# Altium PCB 14MV1.PcbDoc (part 2 of 2)
Units mm, origin at the board's own origin, x right, y up, seen from the top; angles counter-clockwise.
Board outline 48 x 30 mm, 4 copper layers (Top Layer, Layer 1, Layer 2, Bottom Layer), stack 1.743 mm thick; 166 components, 120 nets, 638 pads, 401 vias.
Unrouted connection lines stored in the file: 3.
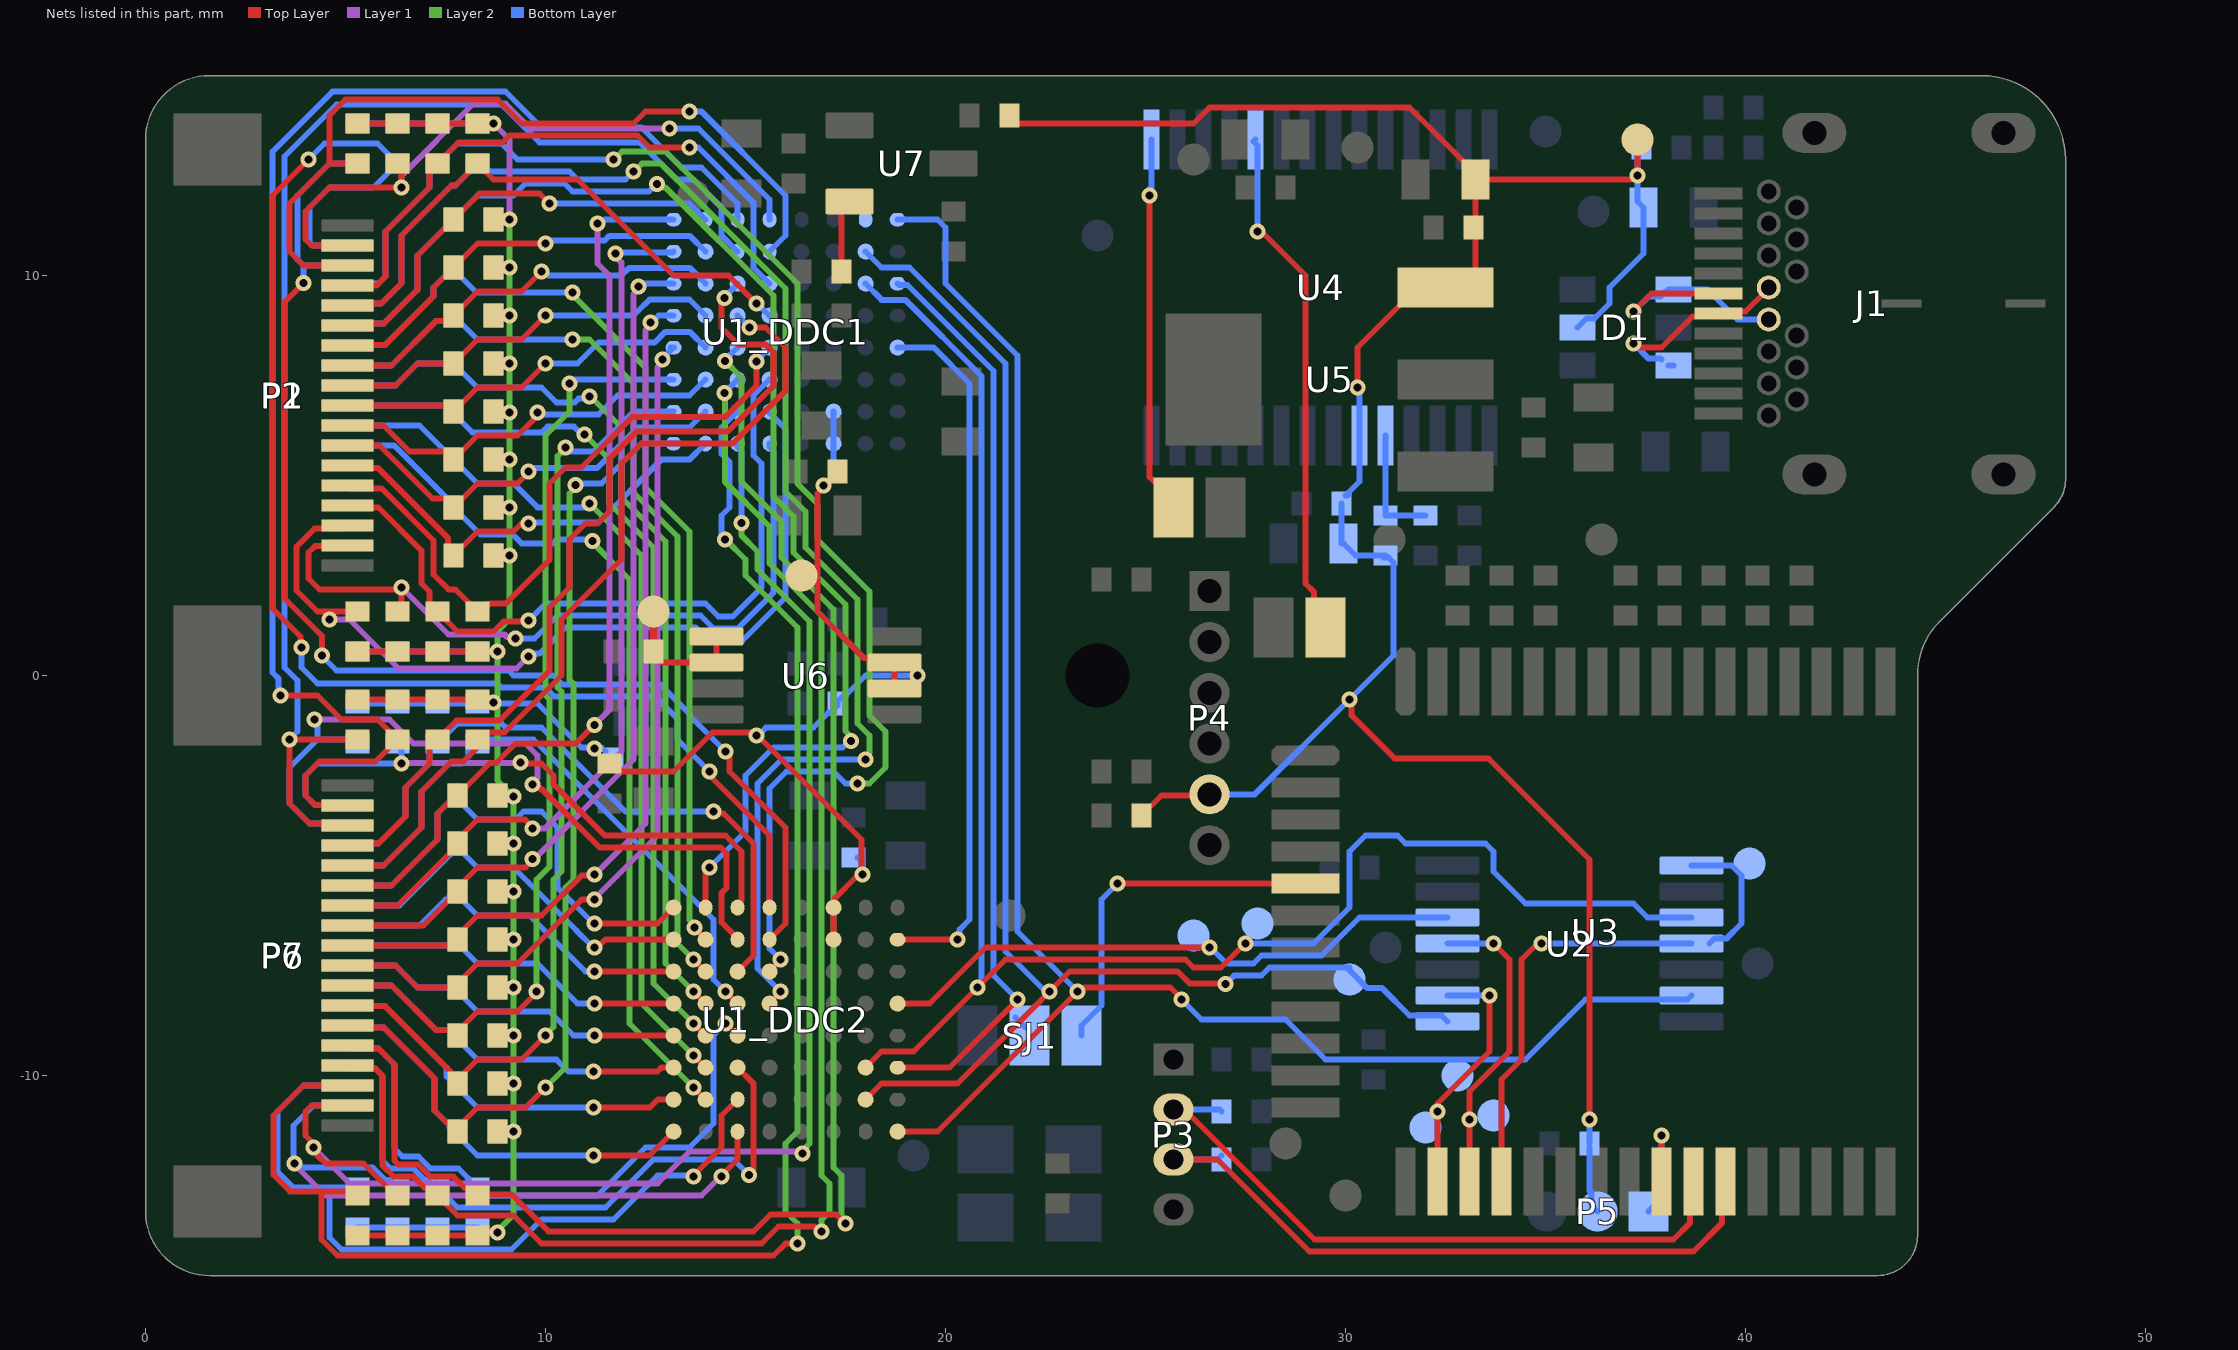
[diagram p4: the nets of this part, all layers, seen from the top]

## Via types
v1: diameter 0.4, hole 0.2, Top Layer to Bottom Layer, tented both sides, 401 vias

## Nets (pads, with @x,y where several pads share a name; then routed paths per layer and width w, separated by ;. In a path a pad name is that pad's centre, name@x,y a point inside that pad or via, vN(x,y) a via of type N, cw(c..) or ccw(c..) an arc to the next point about the centre after c; other vN are vias at no path point) (continued)
NetP1_7: P1.7 R7_DDC2.1 U1_DDC2.G2 | length 22.3
  Top Layer w0.15: v1(13.7,-10.3) U1_DDC2.G2@14,-10.6
  Layer 2 w0.15: v1(11.168,3.367) 11.168,3.333 12.1,2.401 12.1,-8.7 v1(13.7,-10.3)
  Bottom Layer w0.15: P1.7@5.05,5.75 6.216,5.75 7.5,4.466 7.5,4.45 7.55,4.4 7.55,4.35 R7_DDC2.1@7.6,4.3 ; R7_DDC2.1@7.7,4.2 7.7,4.15 7.85,4 7.9,4 8.375,3.525 9.176,3.525 9.401,3.3 10.182,3.3 10.282,3.4 11.075,3.4 11.108,3.367 v1(11.168,3.367)
NetP1_8: P1.8 R8_DDC2.1 U1_DDC2.F2 | length 22.2
  Top Layer w0.15: v1(13.7,-9.5) U1_DDC2.F2@14,-9.8
  Layer 2 w0.15: v1(11.1,4.3) 12.4,3 12.4,-8.2 v1(13.7,-9.5)
  Bottom Layer w0.15: P1.8@5.05,6.25 6.85,6.25 7.5,5.6 7.55,5.6 7.6,5.55 R8_DDC2.1@7.6,5.5 ; R8_DDC2.1@7.7,5.4 7.7,5.35 7.85,5.2 7.9,5.2 8.3,4.8 9.201,4.8 9.801,4.2 11,4.2 v1(11.1,4.3)
NetP1_9: P1.9 R9_DDC2.1 U1_DDC2.E2 | length 22.7
  Top Layer w0.15: v1(13.7,-8.7) U1_DDC2.E2@14,-9
  Layer 2 w0.15: v1(10.975,6.025) 11,6 11.6,5.4 11.6,4.3 12.7,3.2 12.7,-7.7 v1(13.7,-8.7)
  Bottom Layer w0.15: P1.9@5.05,6.75 7.55,6.75 R9_DDC2.1@7.7,6.6 7.7,6.55 8.175,6.075 9.901,6.075 10.051,6.225 10.707,6.225 10.907,6.025 v1(10.975,6.025)
NetP1_10: P1.10 R10_DDC2.1 U1_DDC2.D2 | length 23.2
  Top Layer w0.15: v1(13.7,-7.9) U1_DDC2.D2@14,-8.2
  Layer 2 w0.15: v1(11.1,6.975) 11.125,6.975 11.9,6.2 11.9,4.451 13,3.351 13,-7.2 v1(13.7,-7.9)
  Bottom Layer w0.15: P1.10@5.05,7.25 6.25,7.25 6.8,7.8 R10_DDC2.1@7.7,7.8 7.7,7.75 7.85,7.6 7.9,7.6 8.3,7.2 9.9,7.2 10.275,6.825 10.726,6.825 10.828,6.927 11.052,6.927 v1(11.1,6.975)
NetP1_11: P1.11 R11_DDC2.1 U1_DDC2.C2 | length 23.8
  Top Layer w0.15: v1(13.7,-7.1) U1_DDC2.C2@14,-7.4
  Layer 2 w0.15: v1(10.675,8.4) 11.1,8.4 12.2,7.3 12.2,4.576 13.3,3.476 13.3,-6.7 v1(13.7,-7.1)
  Bottom Layer w0.15: P1.11@5.05,7.75 6.15,7.75 7.267,8.867 7.667,8.867 R11_DDC2.1@7.7,8.9 ; R11_DDC2.1@7.7,9 7.7,8.95 7.85,8.8 7.9,8.8 8.3,8.4 v1(10.675,8.4)
NetP1_12: P1.12 R12_DDC2.1 U1_DDC2.B2 | length 24.4
  Top Layer w0.15: v1(13.725,-6.3) 13.725,-6.313 14,-6.587 U1_DDC2.B2@14,-6.6
  Layer 2 w0.15: v1(10.675,9.575) 10.7,9.55 10.7,9.499 12.5,7.699 12.5,4.7 13.6,3.6 13.6,-6.107 13.725,-6.232 v1(13.725,-6.3)
  Bottom Layer w0.15: P1.12@5.05,8.25 5.062,8.262 5.983,8.262 7.2,9.479 7.2,9.7 7.5,10 7.55,10 R12_DDC2.1@7.7,10.15 ; v1(10.675,9.575) 8.275,9.575 R12_DDC2.1@7.7,10.15 ; R12_DDC2.1@7.7,10.15 R12_DDC2.1@7.7,10.2 R12_DDC2.1@7.7,10.15
NetP1_13: P1.13 R13_DDC2.1 U1_DDC2.A2 | length 32.5
  Top Layer w0.15: U1_DDC2.A2@14,-5.8 14,-5 14,-4.9 v1(14.1,-4.8)
  Layer 2 w0.15: v1(12.787,12.287) 12.855,12.287 12.943,12.199 13.001,12.199 15.7,9.5 15.7,4.476 16.2,3.976 16.2,3.076 17.5,1.776 17.5,-1.387 17.637,-1.524 v1(17.637,-1.638)
  Bottom Layer w0.15: P1.13@5.05,8.75 5.1,8.8 5.956,8.8 6.8,9.644 6.8,10.5 7.475,11.175 7.525,11.175 7.6,11.25 R13_DDC2.1@7.6,11.3 ; R13_DDC2.1@7.7,11.4 7.7,11.45 7.875,11.625 7.925,11.625 8.3,12 9.2,12 9.5,12.3 9.7,12.3 10.475,12.3 10.675,12.1 12.587,12.1 12.774,12.287 v1(12.787,12.287) ; v1(14.1,-4.8) 15,-3.9 15,-2.5 15.7,-1.8 17.424,-1.8 17.586,-1.638 v1(17.637,-1.638)
NetP1_14: P1.14 R14_DDC2.1 U1_DDC2.D4 | length 36.4
  Top Layer w0.15: U1_DDC2.D4@15.6,-8.2 15.6,-8.188 15.875,-7.913 v1(15.875,-7.9)
  Layer 2 w0.15: v1(12.2,12.6) 12.213,12.6 12.413,12.8 12.876,12.8 16,9.676 16,4.6 16.5,4.1 16.5,3.2 17.8,1.9 17.8,-1.2 18.1,-1.5 18.1,-1.932 18,-2.032 v1(18,-2.1)
  Bottom Layer w0.15: P1.14@5.05,9.25 5.1,9.3 5.89,9.3 6.4,9.81 6.4,11 7.65,12.25 7.75,12.25 8.075,12.575 8.075,12.625 8.25,12.8 R14_DDC2.1@8.3,12.8 8.475,12.625 8.588,12.625 8.613,12.6 10.6,12.6 10.8,12.4 12,12.4 v1(12.2,12.6) v1@12.3,12.6 ; v1(15.875,-7.9) 15.3,-7.325 15.3,-2.7 15.9,-2.1 v1(18,-2.1)
NetP1_15: P1.15 R15_DDC2.1 U1_DDC2.C4 | length 36.5
  Top Layer w0.15: U1_DDC2.C4@15.6,-7.4 15.6,-7.388 15.875,-7.113 v1(15.875,-7.1)
  Layer 2 w0.15: v1(11.7,12.9) 11.713,12.9 11.913,13.1 13,13.1 16.3,9.8 16.3,4.799 16.8,4.299 16.8,3.4 18.1,2.1 18.1,-1 18.5,-1.4 18.5,-2.3 18.1,-2.7 v1(17.8,-2.7)
  Bottom Layer w0.15: P1.15@5.05,9.75 5.1,9.8 5.824,9.8 6,9.976 6,11.1 7.1,12.2 7.1,12.65 7.25,12.8 R15_DDC2.1@7.3,12.8 7.35,12.8 7.525,12.975 7.525,13.025 7.8,13.3 8.9,13.3 9.3,12.9 v1(11.7,12.9) ; v1(15.875,-7.1) 15.6,-6.825 15.6,-2.824 16.024,-2.4 17.2,-2.4 17.499,-2.699 v1(17.8,-2.7)
NetP1_16: P1.16 R16_DDC2.1 U1_DDC2.B4 | length 31.6
  Top Layer w0.15: v1(3.95,9.81) 3.475,9.335 3.475,1.925 4.411,0.989 v1(4.411,0.496) ; v1(14.5,-1.9) 14.6,-2 14.6,-2.4 16,-3.8 16,-6.2 U1_DDC2.B4@15.6,-6.6
  Bottom Layer w0.15: v1(3.95,9.81) 3.95,10.25 ; v1(4.411,0.496) 4.411,0.489 4.775,0.125 9.075,0.125 9.2,0 10.2,0 10.425,-0.225 12.868,-0.225 13.6,-0.957 13.6,-1 v1(14.5,-1.9) ; P1.16@5.05,10.25 3.95,10.25 ; R16_DDC2.1@5.2,12.8 4.6,12.8 3.8,12 3.8,10.4 3.95,10.25
NetP1_17: P1.17 R17_DDC2.1 U1_DDC2.A4 | length 36
  Top Layer w0.15: v1(3.9,0.7) 3.874,0.726 3.874,0.976 3.175,1.675 3.175,12 v1(4.075,12.9) ; v1(14.1,-2.4) 14.05,-2.45 15.6,-4 U1_DDC2.A4@15.6,-5.8
  Bottom Layer w0.15: v1(3.9,0.7) 3.9,0.2 4.3,-0.2 8.799,-0.2 8.899,-0.3 10,-0.3 10.225,-0.525 12.743,-0.525 13.3,-1.082 13.3,-1.6 v1(14.1,-2.4) ; v1(4.075,12.9) 4.475,13.3 5.8,13.3 6.075,13.025 6.075,12.975 6.25,12.8 R17_DDC2.1@6.3,12.8 ; P1.17@5.05,10.75 4.188,10.75 4.1,10.838 4.1,11.7 4.6,12.2 5.7,12.2 6.1,12.6 6.1,12.65 6.15,12.7 R17_DDC2.1@6.2,12.7
NetP2_2: P2.2 R2_DDC1.1 U1_DDC1.H4 | length 16.8
  Top Layer w0.15: P2.2@5.05,10.75 4.15,10.75 4,10.9 4,11.6 4.6,12.2 v1(6.4,12.2) ; R2_DDC1.1@6.3,12.8 6.4,12.7 6.4,12.288 v1@6.356,12.244
  Layer 1 w0.15: v1(6.4,12.2) 6.401,12.501 8.2,14.3 9,14.3 9.625,13.675 v1(13.1,13.675)
  Bottom Layer w0.15: v1(13.1,13.675) 13.825,13.675 15.6,11.9 U1_DDC1.H4@15.6,11.4
NetP2_3: P2.3 R3_DDC1.1 U1_DDC1.G4 | length 20.4
  Top Layer w0.15: P2.3@5.05,10.25 3.95,10.25 3.6,10.6 3.6,11.8 4.6,12.8 ; R3_DDC1.1@5.2,12.8 4.6,12.8 ; v1(13.6,14.1) 12.5,14.1 12.2,13.8 9.4,13.8 8.8,14.4 5,14.4 4.6,14 4.6,12.8
  Bottom Layer w0.15: v1(13.6,14.1) 13.901,14.099 16,12 16,11 U1_DDC1.G4@15.6,10.6
NetP2_4: P2.4 R4_DDC1.1 U1_DDC1.F4 | length 15.7
  Top Layer w0.15: P2.4@5.05,9.75 5.054,9.754 5.778,9.754 6,9.976 6,11.1 7.1,12.2 7.1,12.65 7.25,12.8 R4_DDC1.1@7.3,12.8 7.35,12.8 7.525,12.975 7.525,13.025 7.825,13.325 8.925,13.325 9.1,13.5 12.3,13.5 12.6,13.2 v1@13.733,13.2
  Bottom Layer w0.15: v1(13.6,13.2) 13.824,13.2 15.2,11.824 15.2,10.2 U1_DDC1.F4@15.6,9.8
NetP2_5: P2.5 R5_DDC1.1 U1_DDC1.E4 | length 14.3
  Top Layer w0.15: P2.5@5.05,9.25 5.1,9.3 5.89,9.3 6.4,9.81 6.4,11 7.65,12.25 7.75,12.25 8.1,12.6 8.1,12.65 R5_DDC1.1@8.25,12.8 ; R5_DDC1.1@8.3,12.8 R5_DDC1.1@8.4,12.9 ; R5_DDC1.1@8.4,12.7 8.45,12.7 8.525,12.625 8.525,12.575 8.7,12.4 10.8,12.4 13.2,10 14.574,10 v1(15.275,9.299) v1@15.3,9.324
  Bottom Layer w0.15: v1(15.275,9.299) 15.288,9.299 15.587,9 U1_DDC1.E4@15.6,9
NetP2_6: P2.6 R6_DDC1.1 U1_DDC1.H2 | length 11
  Top Layer w0.15: P2.6@5.05,8.75 5.1,8.8 5.956,8.8 6.8,9.644 6.8,10.5 7.475,11.175 7.525,11.175 7.6,11.25 R6_DDC1.1@7.6,11.3 ; R6_DDC1.1@7.7,11.4 7.7,11.45 7.875,11.625 7.925,11.625 8.352,12.052 9.848,12.052 v1(10.1,11.8)
  Bottom Layer w0.15: v1(10.1,11.8) 13.6,11.8 U1_DDC1.H2@14,11.4
NetP2_7: P2.7 R7_DDC1.1 U1_DDC1.G2 | length 10.4
  Top Layer w0.15: P2.7@5.05,8.25 5.062,8.262 5.983,8.262 7.2,9.479 7.2,9.7 7.5,10 7.55,10 7.7,10.15 R7_DDC1.1@7.7,10.2 7.7,10.25 7.875,10.425 7.925,10.425 8.3,10.8 v1(10,10.8)
  Bottom Layer w0.15: v1(10,10.8) 10.071,10.871 11.472,10.871 11.596,10.995 13.605,10.995 U1_DDC1.G2@14,10.6
NetP2_8: P2.8 R8_DDC1.1 U1_DDC1.F2 | length 10.2
  Top Layer w0.15: P2.8@5.05,7.75 6.15,7.75 7.267,8.867 7.667,8.867 R8_DDC1.1@7.7,8.9 ; R8_DDC1.1@7.7,9 7.7,9.05 7.875,9.225 7.925,9.225 8.3,9.6 9.4,9.6 v1(9.9,10.1)
  Bottom Layer w0.15: v1(9.9,10.1) 9.968,10.1 10.068,10 11.9,10 12.095,10.195 13.605,10.195 U1_DDC1.F2@14,9.8
NetP2_9: P2.9 R9_DDC1.1 U1_DDC1.E2 | length 10
  Top Layer w0.15: P2.9@5.05,7.25 6.25,7.25 6.8,7.8 R9_DDC1.1@7.7,7.8 7.7,7.85 7.875,8.025 7.925,8.025 8.3,8.4 9.4,8.4 v1(10,9)
  Bottom Layer w0.15: v1(10,9) 12.2,9 12.475,9.275 ; 12.476,9.275 12.601,9.4 13.6,9.4 U1_DDC1.E2@14,9
NetP2_10: P2.10 R10_DDC1.1 U1_DDC1.D2 | length 10
  Top Layer w0.15: P2.10@5.05,6.75 7.55,6.75 R10_DDC1.1@7.7,6.6 7.7,6.65 7.875,6.825 7.925,6.825 8.3,7.2 9.4,7.2 v1(10,7.8)
  Bottom Layer w0.15: v1(10,7.8) 10.8,7.8 11.325,8.325 12.727,8.325 12.997,8.595 13.605,8.595 U1_DDC1.D2@14,8.2
NetP2_11: P2.11 R11_DDC1.1 U1_DDC1.C2 | length 10.1
  Top Layer w0.15: P2.11@5.05,6.25 5.95,6.25 6.6,5.6 7.55,5.6 7.6,5.55 R11_DDC1.1@7.6,5.5 ; R11_DDC1.1@7.7,5.4 7.7,5.45 7.875,5.625 7.925,5.625 8.3,6 9.3,6 9.699,6.399 9.699,6.432 9.8,6.532 v1(9.8,6.575)
  Bottom Layer w0.15: v1(9.8,6.575) 9.848,6.527 10.149,6.527 10.151,6.525 11.325,6.525 11.8,7 13.6,7 U1_DDC1.C2@14,7.4
NetP2_12: P2.12 R12_DDC1.1 U1_DDC1.B2 | length 10.5
  Top Layer w0.15: P2.12@5.05,5.75 5.85,5.75 7.175,4.425 7.525,4.425 7.6,4.35 R12_DDC1.1@7.6,4.3 ; R12_DDC1.1@7.7,4.2 7.7,4.25 7.875,4.425 7.925,4.425 8.3,4.8 9.3,4.8 9.575,5.075 v1(9.575,5.1)
  Bottom Layer w0.15: v1(9.575,5.1) 9.6,5.1 9.689,5.189 11.289,5.189 12.3,6.2 13.6,6.2 U1_DDC1.B2@14,6.6
NetP2_13: P2.13 R13_DDC1.1 U1_DDC1.A2 | length 11.2
  Top Layer w0.15: P2.13@5.05,5.25 5.109,5.191 5.809,5.191 7.566,3.434 7.566,3.134 R13_DDC1.1@7.7,3 ; R13_DDC1.1@7.7,3.05 7.85,3.2 7.9,3.2 8.3,3.6 9.2,3.6 9.4,3.8 v1(9.575,3.8)
  Bottom Layer w0.15: v1(9.575,3.8) 9.6,3.825 11.325,3.825 12.905,5.405 13.605,5.405 U1_DDC1.A2@14,5.8
NetP2_14: P2.14 R14_DDC1.1 U1_DDC1.D4 | length 16.6
  Top Layer w0.15: P2.14@5.05,4.75 5.125,4.675 5.901,4.675 7.2,3.376 7.2,2.526 7.576,2.15 7.75,2.15 8.075,1.825 8.075,1.775 8.25,1.6 R14_DDC1.1@8.3,1.6 8.475,1.775 8.588,1.775 8.613,1.8 9.006,1.8 10.1,2.894 10.1,4.8 10.5,5.2 10.9,5.2 12.16,6.46 14.487,6.46 15.275,7.248 v1(15.275,7.85)
  Bottom Layer w0.15: v1(15.275,7.85) 15.275,7.862 15.6,8.187 U1_DDC1.D4@15.6,8.2
NetP2_15: P2.15 R15_DDC1.1 U1_DDC1.C4 | length 18.4
  Top Layer w0.15: P2.15@5.05,4.25 5.1,4.2 5.824,4.2 6.9,3.124 6.9,2.3 7.1,2.1 7.1,1.75 7.15,1.7 R15_DDC1.1@7.2,1.7 ; R15_DDC1.1@7.3,1.6 7.35,1.6 7.525,1.425 7.525,1.375 7.8,1.1 8.7,1.1 8.952,1.352 9.551,1.352 v1(9.574,1.375)
  Bottom Layer w0.15: v1(9.574,1.375) v1@9.599,1.401 ; v1@9.601,1.401 10,1.8 13.999,1.8 14.324,1.475 14.676,1.475 15.4,2.199 15.4,5.3 15.2,5.5 15.2,7 U1_DDC1.C4@15.6,7.4
NetP2_16: P2.16 R16_DDC1.1 U1_DDC1.B4 | length 22.3
  Top Layer w0.15: v1(4.601,1.4) 4.6,1.401 4.6,1.6 ; P2.16@5.05,3.75 4.975,3.675 4.226,3.675 3.775,3.224 3.775,2.125 4.3,1.6 4.6,1.6 ; R16_DDC1.1@5.3,1.6 4.6,1.6
  Layer 1 w0.15: v1(4.601,1.4) 5.1,1.4 6.325,0.175 9.275,0.175 9.575,0.475 v1(9.575,0.48)
  Bottom Layer w0.15: v1(9.575,0.48) 9.643,0.548 9.848,0.548 10.5,1.2 13.75,1.2 14.075,0.875 14.925,0.875 16,1.95 16,6.17 15.6,6.57 U1_DDC1.B4@15.6,6.6
NetP2_17: P2.17 R17_DDC1.1 U1_DDC1.A4 | length 19.1
  Top Layer w0.15: P2.17@5.05,3.25 5.038,3.238 4.238,3.238 4.075,3.075 4.075,2.425 4.35,2.15 6.312,2.15 v1@6.331,2.132 ; R17_DDC1.1@6.3,1.6 6.4,1.7 6.4,2.132 6.4,2.199 v1(6.399,2.2)
  Layer 1 w0.15: v1@6.4,2.2 7.575,1.025 8.976,1.025 9.032,0.969 9.199,0.969 v1(9.246,0.921)
  Bottom Layer w0.15: v1(9.246,0.921) 9.25,0.925 9.725,0.925 10.3,1.5 13.875,1.5 14.2,1.175 14.8,1.175 15.7,2.075 15.7,5.619 15.6,5.719 U1_DDC1.A4@15.6,5.8
NetP5_1: P5.1 U3.21 | length 2.9
  Top Layer w0.15: U3.21@37.9,-12.4 v1(37.9,-11.5)
  Bottom Layer w0.15: P5.1@37.57,-13.4 37.9,-13.07 v1(37.9,-11.5)
NetP6_2: P6.2 R18_DDC2.1 U1_DDC2.H3 | length 17.9
  Top Layer w0.15: v1(14.4,-12.525) 14.4,-12.5 14.8,-12.1 U1_DDC2.H3@14.8,-11.4
  Layer 1 w0.15: v1(3.725,-12.199) 3.725,-12.225 4.5,-13 13.9,-13 14.375,-12.525 v1(14.4,-12.525)
  Bottom Layer w0.15: v1@3.701,-12.2 3.768,-12.2 3.868,-12.3 5.676,-12.3 6.001,-12.625 6.125,-12.625 R18_DDC2.1@6.3,-12.8 ; v1(3.725,-12.199) 3.7,-12.174 3.7,-11.25 4.2,-10.75 P6.2@5.05,-10.75
NetP6_3: P6.3 R19_DDC2.1 U1_DDC2.G3 | length 19.2
  Top Layer w0.15: v1(13.7,-12.525) 13.7,-12.5 14.4,-11.8 14.4,-11 U1_DDC2.G3@14.8,-10.6
  Bottom Layer w0.15: P6.3@5.05,-10.25 3.95,-10.25 3.3,-10.9 3.3,-12.4 3.7,-12.8 4.6,-12.8 ; R19_DDC2.1@5.2,-12.8 4.6,-12.8 ; v1(13.7,-12.525) 13.675,-12.5 12.8,-12.5 11.7,-13.6 9.9,-13.6 9.15,-14.35 4.9,-14.35 4.6,-14.05 4.6,-12.8
NetP6_4: P6.4 R20_DDC2.1 U1_DDC2.F3 | length 16.2
  Top Layer w0.15: U1_DDC2.F3@14.8,-9.8 15.195,-10.195 v1@15.195,-12.337
  Bottom Layer w0.15: P6.4@5.05,-9.75 5.125,-9.825 5.743,-9.825 5.925,-10.007 5.925,-12.125 6.125,-12.325 6.693,-12.325 6.993,-12.625 7.075,-12.625 7.2,-12.75 R20_DDC2.1@7.2,-12.8 ; R20_DDC2.1@7.25,-12.7 7.5,-12.95 7.5,-13 7.8,-13.3 11.5,-13.3 12.7,-12.1 14.7,-12.1 v1(15.087,-12.487)
NetP6_5: P6.5 R21_DDC2.1 U1_DDC2.E3 | length 15.8
  Top Layer w0.15: v1(14.5,-8.7) U1_DDC2.E3@14.8,-9
  Bottom Layer w0.15: P6.5@5.05,-9.25 5.125,-9.325 5.825,-9.325 6.225,-9.725 6.225,-11.825 6.425,-12.025 6.825,-12.025 7.125,-12.325 7.825,-12.325 8.075,-12.575 8.075,-12.625 8.25,-12.8 R21_DDC2.1@8.3,-12.8 8.475,-12.975 8.588,-12.975 8.613,-13 11.3,-13 12.5,-11.8 13.6,-11.8 14.2,-11.2 14.2,-9 v1(14.5,-8.7)
NetP6_6: P6.6 R22_DDC2.1 U1_DDC2.H1 | length 10.1
  Top Layer w0.15: v1(11.2,-12) 12.6,-12 U1_DDC2.H1@13.2,-11.4
  Bottom Layer w0.15: P6.6@5.05,-8.75 5.1,-8.8 5.956,-8.8 7.225,-10.069 7.225,-10.875 7.6,-11.25 R22_DDC2.1@7.6,-11.3 ; R22_DDC2.1@7.7,-11.4 7.7,-11.45 7.85,-11.6 7.9,-11.6 8.3,-12 v1(11.2,-12)
NetP6_7: P6.7 R23_DDC2.1 U1_DDC2.G1 | length 9.4
  Top Layer w0.15: v1(11.2,-10.8) 12.608,-10.8 12.808,-10.6 U1_DDC2.G1@13.2,-10.6
  Bottom Layer w0.15: P6.7@5.05,-8.25 5.062,-8.262 5.983,-8.262 7.2,-9.479 7.525,-9.804 7.525,-10.025 7.7,-10.2 7.7,-10.25 7.85,-10.4 7.9,-10.4 8.3,-10.8 v1(11.2,-10.8)
NetP6_8: P6.8 R24_DDC2.1 U1_DDC2.F1 | length 9.1
  Top Layer w0.15: v1(11.2,-9.9) 12.8,-9.9 12.896,-9.804 13.196,-9.804 U1_DDC2.F1@13.2,-9.8
  Bottom Layer w0.15: P6.8@5.05,-7.75 6.15,-7.75 7.267,-8.867 7.667,-8.867 R24_DDC2.1@7.7,-8.9 ; R24_DDC2.1@7.7,-9 7.7,-9.05 7.85,-9.2 7.9,-9.2 8.3,-9.6 10.268,-9.6 10.568,-9.9 v1(11.2,-9.9)
NetP6_9: P6.9 R25_DDC2.1 U1_DDC2.E1 | length 8.9
  Top Layer w0.15: v1(11.225,-9) U1_DDC2.E1@13.2,-9
  Bottom Layer w0.15: P6.9@5.05,-7.25 6.25,-7.25 6.8,-7.8 7.7,-7.8 7.7,-7.85 7.85,-8 7.9,-8 8.3,-8.4 10.1,-8.4 10.7,-9 v1(11.225,-9)
NetP6_10: P6.10 R26_DDC2.1 U1_DDC2.D1 | length 8.9
  Top Layer w0.15: v1(11.225,-8.2) U1_DDC2.D1@13.2,-8.2
  Bottom Layer w0.15: P6.10@5.05,-6.75 7.55,-6.75 7.7,-6.6 7.7,-6.65 7.85,-6.8 7.9,-6.8 8.3,-7.2 9.8,-7.2 10.8,-8.2 v1(11.225,-8.2)
NetP6_11: P6.11 R27_DDC2.1 U1_DDC2.C1 | length 9.2
  Top Layer w0.15: v1(11.225,-7.4) U1_DDC2.C1@13.2,-7.4
  Bottom Layer w0.15: P6.11@5.05,-6.25 6.85,-6.25 7.5,-5.6 7.55,-5.6 7.6,-5.55 R27_DDC2.1@7.6,-5.5 ; R27_DDC2.1@7.7,-5.4 7.7,-5.45 7.85,-5.6 7.9,-5.6 8.3,-6 9.6,-6 11,-7.4 v1(11.225,-7.4)
NetP6_12: P6.12 R28_DDC2.1 U1_DDC2.B1 | length 9.9
  Top Layer w0.15: v1(11.225,-6.8) 11.293,-6.8 11.493,-6.6 U1_DDC2.B1@13.2,-6.6
  Bottom Layer w0.15: P6.12@5.05,-5.75 6.35,-5.75 7.625,-4.475 7.625,-4.425 7.755,-4.295 R28_DDC2.1@7.805,-4.295 ; R28_DDC2.1@7.775,-4.325 7.85,-4.4 7.9,-4.4 8.3,-4.8 9.2,-4.8 10.775,-6.375 ; 10.775,-6.376 11.199,-6.8 v1(11.225,-6.8)
NetP6_13: P6.13 R29_DDC2.1 U1_DDC2.A1 | length 11.9
  Top Layer w0.15: v1(11.225,-6.2) 12.8,-6.2 U1_DDC2.A1@13.2,-5.8
  Bottom Layer w0.15: P6.13@5.05,-5.25 6.15,-5.25 7.3,-4.1 7.3,-3.45 7.65,-3.1 R29_DDC2.1@7.7,-3.1 ; R29_DDC2.1@7.7,-3.05 7.85,-3.2 7.9,-3.2 8.3,-3.6 9.25,-3.6 9.45,-3.4 9.9,-3.4 10.3,-3.8 10.3,-5.301 11.199,-6.2 v1(11.225,-6.2)
NetP6_14: P6.14 R30_DDC2.1 U1_DDC2.D3 | length 15.2
  Top Layer w0.15: v1(14.5,-7.9) U1_DDC2.D3@14.8,-8.2
  Bottom Layer w0.15: P6.14@5.05,-4.75 5.95,-4.75 6.9,-3.8 6.9,-2.9 7.6,-2.2 7.9,-2.2 8.075,-2.025 8.075,-1.875 8.15,-1.8 R30_DDC2.1@8.3,-1.8 ; R30_DDC2.1@8.3,-1.6 9.7,-1.6 14.2,-6.1 14.2,-7.6 v1(14.5,-7.9)
NetP6_15: P6.15 R31_DDC2.1 U1_DDC2.C3 | length 16.6
  Top Layer w0.15: v1(14.2,-3.4) 14.248,-3.448 14.448,-3.448 15.2,-4.2 15.2,-7 U1_DDC2.C3@14.8,-7.4
  Bottom Layer w0.15: P6.15@5.05,-4.25 5.1,-4.2 5.824,-4.2 6.5,-3.524 6.5,-2.8 7.1,-2.2 7.1,-1.75 7.15,-1.7 R31_DDC2.1@7.2,-1.7 ; R31_DDC2.1@7.3,-1.6 7.35,-1.6 7.4,-1.6 7.8,-1.2 8.9,-1.2 9,-1.3 9.9,-1.3 12,-3.4 v1(14.2,-3.4)
NetP6_16: P6.16 R32_DDC2.1 U1_DDC2.B3 | length 19.8
  Top Layer w0.15: v1(9.675,-2.725) 9.768,-2.725 9.877,-2.834 9.892,-2.834 11.358,-4.3 14.376,-4.3 14.525,-4.449 14.525,-5.314 14.405,-5.434 14.405,-6.175 14.8,-6.57 U1_DDC2.B3@14.8,-6.6
  Layer 1 w0.15: v1(4.225,-1.1) 6.1,-1.1 6.7,-1.7 9.5,-1.7 9.8,-2 9.8,-2.557 9.675,-2.682 v1(9.675,-2.725)
  Bottom Layer w0.15: v1(4.225,-1.1) 4.225,-1.168 4.3,-1.243 4.3,-1.6 ; P6.16@5.05,-3.75 5,-3.7 4.1,-3.7 3.6,-3.2 3.6,-2.3 4.3,-1.6 ; R32_DDC2.1@5.3,-1.6 4.3,-1.6
NetP6_17: P6.17 R33_DDC2.1 U1_DDC2.A3 | length 15.6
  Top Layer w0.15: v1(9.374,-2.176) 9.399,-2.2 9.9,-2.2 10.2,-2.5 10.2,-2.718 11.482,-4 14.324,-4 14.5,-4 14.9,-4.4 14.9,-5.619 14.8,-5.719 U1_DDC2.A3@14.8,-5.8
  Layer 1 w0.15: v1(6.4,-2.2) 6.412,-2.187 9.363,-2.187 v1(9.374,-2.176)
  Bottom Layer w0.15: P6.17@5.05,-3.25 5.038,-3.238 4.238,-3.238 4,-3 4,-2.5 4.3,-2.2 6.285,-2.2 v1@6.331,-2.153 ; v1(6.4,-2.2) 6.4,-2.131 R33_DDC2.1@6.4,-1.7
NetP7_2: P7.2 R18_DDC1.1 U1_DDC1.H3 | length 35
  Top Layer w0.15: v1(3.375,-0.5) 4.3,-0.5 4.9,-1.1 5.8,-1.1 6.075,-1.375 6.075,-1.425 6.25,-1.6 R18_DDC1.1@6.3,-1.6 ; P7.2@5.05,-3.25 5.038,-3.238 4.238,-3.238 4,-3 4,-2.5 4.35,-2.15 5.75,-2.15 6.1,-1.8 R18_DDC1.1@6.1,-1.7
  Bottom Layer w0.15: v1(3.375,-0.5) 3.327,-0.452 3.327,-0.076 3.175,0.076 3.175,13.099 4.676,14.6 9,14.6 9.9,13.7 12.4,13.7 13.4,12.7 13.9,12.7 14.8,11.8 U1_DDC1.H3@14.8,11.4
NetP7_3: P7.3 R19_DDC1.1 U1_DDC1.G3 | length 33.5
  Top Layer w0.15: P7.3@5.05,-3.75 5,-3.7 4.1,-3.7 3.6,-3.2 3.6,-1.7 3.7,-1.6 R19_DDC1.1@5.3,-1.6
  Bottom Layer w0.15: v1(3.6,-1.6) 3.8,-1.4 3.8,-0.124 3.475,0.201 3.475,12.975 4.775,14.275 8.901,14.275 9.851,13.325 12.351,13.325 13.276,12.4 13.7,12.4 14.395,11.705 14.395,11.005 U1_DDC1.G3@14.8,10.6
NetP7_4: P7.4 R20_DDC1.1 U1_DDC1.F3 | length 22.1
  Top Layer w0.15: P7.4@5.05,-4.25 5.1,-4.2 5.824,-4.2 6.5,-3.524 6.5,-2.8 7.1,-2.2 7.1,-1.75 7.15,-1.7 R20_DDC1.1@7.2,-1.7 ; R20_DDC1.1@7.3,-1.6 7.35,-1.6 7.525,-1.425 7.525,-1.375 7.775,-1.125 8.851,-1.125 10.1,0.124 10.1,1.7 10.6,2.2 10.6,3.4 11,3.8 11.3,3.8 11.6,4.1 11.6,5.424 12.276,6.1 14.551,6.1 15.7,7.249 15.7,8.076 15.501,8.275 15.276,8.275 14.825,8.275 14.4,8.7 14.4,9.312 14.47,9.382 v1(14.47,9.44)
  Bottom Layer w0.15: v1@14.5,9.4 14.5,9.478 14.8,9.778 U1_DDC1.F3@14.8,9.8
NetP7_5: P7.5 R21_DDC1.1 U1_DDC1.E3 | length 21.1
  Top Layer w0.15: P7.5@5.05,-4.75 5.95,-4.75 6.9,-3.8 6.9,-2.9 7.65,-2.15 7.95,-2.15 R21_DDC1.1@8.3,-1.8 ; R21_DDC1.1@8.3,-1.6 8.475,-1.425 8.975,-1.425 10.4,0 10.4,1.4 11.9,2.9 11.9,5.3 12.4,5.8 14.676,5.8 16,7.124 16,8.2 15.5,8.7 v1(15.1,8.7)
  Bottom Layer w0.15: U1_DDC1.E3@14.8,9 v1(15.1,8.7)
NetP7_6: P7.6 R22_DDC1.1 U1_DDC1.H1 | length 22.9
  Top Layer w0.15: P7.6@5.05,-5.25 6.15,-5.25 7.3,-4.1 7.3,-3.45 7.65,-3.1 R22_DDC1.1@7.7,-3.1 ; R22_DDC1.1@7.7,-2.95 7.875,-2.775 8.025,-2.775 8.613,-2.187 8.761,-2.187 9.249,-1.7 10.757,-1.7 v1(11.225,-1.232)
  Layer 1 w0.15: v1(11.225,-1.232) 11.6,-0.857 11.6,10 11.3,10.3 v1@11.3,11.299
  Bottom Layer w0.15: v1(11.299,11.299) 11.368,11.3 11.468,11.4 U1_DDC1.H1@13.2,11.4
NetP7_7: P7.7 R23_DDC1.1 U1_DDC1.G1 | length 22.7
  Top Layer w0.15: P7.7@5.05,-5.75 6.3,-5.75 7.625,-4.425 7.7,-4.35 R23_DDC1.1@7.7,-4.3 ; R23_DDC1.1@7.7,-4.2 7.7,-4.15 7.875,-3.975 7.925,-3.975 8.3,-3.6 9.487,-3.6 9.675,-3.788 v1(9.675,-3.825)
  Layer 1 w0.15: v1(9.675,-3.825) 9.976,-3.824 11.9,-1.9 11.9,10.325 11.746,10.479 v1(11.746,10.546)
  Bottom Layer w0.15: v1(11.746,10.546) 11.773,10.573 13.173,10.573 U1_DDC1.G1@13.2,10.6
NetP7_8: P7.8 R24_DDC1.1 U1_DDC1.F1 | length 21.3
  Top Layer w0.15: P7.8@5.05,-6.25 6.95,-6.25 7.575,-5.625 7.625,-5.625 7.7,-5.55 R24_DDC1.1@7.7,-5.5 ; R24_DDC1.1@7.925,-5.175 8.3,-4.8 9.5,-4.8 9.675,-4.625 v1(9.675,-4.587)
  Layer 1 w0.15: v1(9.675,-4.587) 9.713,-4.587 12.2,-2.1 12.2,9.531 12.325,9.656 v1(12.325,9.723)
  Bottom Layer w0.15: v1(12.325,9.723) 12.391,9.723 12.468,9.8 U1_DDC1.F1@13.2,9.8
NetP7_9: P7.9 R25_DDC1.1 U1_DDC1.E1 | length 22
  Top Layer w0.15: P7.9@5.05,-6.75 7.55,-6.75 7.7,-6.6 7.7,-6.55 7.875,-6.375 7.925,-6.375 8.3,-6 9.9,-6 10.899,-5.001 11.198,-5.001 v1(11.225,-4.974)
  Layer 1 w0.15: v1@11.226,-4.974 12.5,-3.7 12.5,8.631 12.625,8.756 v1(12.625,8.824)
  Bottom Layer w0.15: v1(12.625,8.824) 12.652,8.824 12.828,9 U1_DDC1.E1@13.2,9
NetP7_10: P7.10 R26_DDC1.1 U1_DDC1.D1 | length 22
  Top Layer w0.15: P7.10@5.05,-7.25 6.25,-7.25 6.8,-7.8 7.7,-7.8 7.7,-7.75 7.875,-7.575 7.925,-7.575 8.3,-7.2 9.3,-7.2 9.8,-6.7 10.899,-5.601 v1(11.225,-5.6)
  Layer 1 w0.15: v1(11.225,-5.6) 11.225,-5.575 12.8,-4 12.8,7.707 12.925,7.832 v1(12.925,7.9)
  Bottom Layer w0.15: v1@13,7.9 12.993,7.907 12.993,7.995 U1_DDC1.D1@13.198,8.2 ; U1_DDC1.D1@13.119,8.2 U1_DDC1.D1@13.198,8.2 ; U1_DDC1.D1@13.215,8.2 U1_DDC1.D1@13.2,8.2 U1_DDC1.D1@13.198,8.2
NetP7_11: P7.11 R27_DDC1.1 U1_DDC1.C1 | length 24
  Top Layer w0.15: P7.11@5.05,-7.75 6.15,-7.75 7.267,-8.867 7.667,-8.867 R27_DDC1.1@7.7,-8.9 ; R27_DDC1.1@7.7,-9 7.7,-8.95 7.875,-8.775 7.925,-8.775 8.3,-8.4 9.3,-8.4 9.775,-7.925 v1(9.775,-7.9)
  Layer 2 w0.15: v1(9.775,-7.9) 9.775,-5.101 10.1,-4.776 10.1,-0.6 10,-0.5 10,6 10.6,6.6 v1(10.6,7.3)
  Bottom Layer w0.15: v1(10.6,7.3) 10.7,7.4 U1_DDC1.C1@13.2,7.4
NetP7_12: P7.12 R28_DDC1.1 U1_DDC1.B1 | length 24.5
  Top Layer w0.15: P7.12@5.05,-8.25 5.062,-8.262 5.983,-8.262 7.625,-9.904 7.625,-10.125 R28_DDC1.1@7.7,-10.2 ; R28_DDC1.1@7.7,-10.15 7.875,-9.975 7.925,-9.975 8.3,-9.6 9.4,-9.6 v1(10,-9)
  Layer 2 w0.15: v1(10,-9) 10,-8.987 10.2,-8.787 10.2,-5.1 10.4,-4.9 10.4,-0.4 10.3,-0.3 10.3,5.487 10.5,5.687 v1(10.5,5.7)
  Bottom Layer w0.15: v1(10.5,5.7) 10.6,5.6 11.2,5.6 12.2,6.6 U1_DDC1.B1@13.2,6.6
NetP7_13: P7.13 R29_DDC1.1 U1_DDC1.A1 | length 25.2
  Top Layer w0.15: P7.13@5.05,-8.75 5.1,-8.8 5.956,-8.8 7.225,-10.069 7.225,-10.875 7.525,-11.175 R29_DDC1.1@7.6,-11.25 ; R29_DDC1.1@7.7,-11.4 7.7,-11.35 7.875,-11.175 7.925,-11.175 8.3,-10.8 9.5,-10.8 v1(10,-10.3)
  Layer 2 w0.15: v1(10,-10.3) 10.5,-9.8 10.5,-5.3 10.7,-5.1 10.7,-0.2 10.6,-0.1 10.6,4.551 10.754,4.705 v1(10.754,4.764)
  Bottom Layer w0.15: v1(10.754,4.764) 10.789,4.8 11.4,4.8 12.4,5.8 U1_DDC1.A1@13.2,5.8
NetP7_14: P7.14 R30_DDC1.1 U1_DDC1.D3 | length 39.3
  Top Layer w0.15: P7.14@5.05,-9.25 5.109,-9.309 5.809,-9.309 6.225,-9.725 6.225,-12.126 6.324,-12.225 6.817,-12.225 7.117,-12.525 7.693,-12.525 7.993,-12.825 8.075,-12.825 8.225,-12.975 9.151,-12.975 10.076,-13.9 15.2,-13.9 15.625,-13.475 17.262,-13.475 17.487,-13.7 v1(17.5,-13.7)
  Layer 2 w0.15: v1(14.484,7.867) 14.9,7.451 14.9,4.851 15.9,3.851 15.9,2.951 17.2,1.651 17.2,-12.3 17.4,-12.5 17.4,-13.532 17.5,-13.632 v1(17.5,-13.7)
  Bottom Layer w0.15: v1@14.484,7.884 U1_DDC1.D3@14.8,8.2
NetP7_15: P7.15 R31_DDC1.1 U1_DDC1.C3 | length 37.6
  Top Layer w0.15: P7.15@5.05,-9.75 5.125,-9.825 5.743,-9.825 5.925,-10.007 5.925,-12.251 6.199,-12.525 6.693,-12.525 6.993,-12.825 7.075,-12.825 R31_DDC1.1@7.275,-13.025 ; R31_DDC1.1@7.525,-13.225 7.8,-13.5 9.2,-13.5 9.9,-14.2 15.4,-14.2 15.825,-13.775 16.707,-13.775 16.832,-13.9 v1(16.9,-13.9)
  Layer 2 w0.15: v1(14.475,7.067) 14.484,7.058 14.484,4.843 15.6,3.727 15.6,2.8 16.9,1.5 16.9,-12.5 17.1,-12.7 17.1,-13.4 16.901,-13.599 v1@16.901,-13.999
  Bottom Layer w0.15: v1(14.475,7.067) 14.475,7.071 14.8,7.396 U1_DDC1.C3@14.8,7.4
NetP7_16: P7.16 R32_DDC1.1 U1_DDC1.B3 | length 41.4
  Top Layer w0.15: P7.16@5.05,-10.25 3.95,-10.25 3.2,-11 3.2,-12.483 3.617,-12.9 4.4,-12.9 ; R32_DDC1.1@5.3,-13 5.2,-12.9 4.4,-12.9 ; v1@16.199,-14.201 15.999,-14.201 15.7,-14.5 4.8,-14.5 4.4,-14.1 4.4,-12.9
  Layer 2 w0.15: v1(14.49,3.398) 14.502,3.398 15,2.9 15,2.5 16.3,1.2 16.3,-11.4 16,-11.7 16,-13.4 16.3,-13.7 v1(16.3,-14.2)
  Bottom Layer w0.15: v1(14.49,3.398) 14.49,3.465 14.4,3.555 14.4,4 14.6,4.2 14.6,5.342 14.4,5.542 14.4,6.2 U1_DDC1.B3@14.8,6.6
NetP7_17: P7.17 R33_DDC1.1 U1_DDC1.A3 | length 36
  Top Layer w0.15: v1(4.2,-11.8) 4.2,-11.868 4.301,-11.968 4.301,-12.001 4.5,-12.2 5.45,-12.2 6.1,-12.85 R33_DDC1.1@6.1,-12.9 ; v1@4.25,-11.75 4,-11.5 4,-10.9 4.15,-10.75 P7.17@5.05,-10.75
  Layer 1 w0.15: v1(4.2,-11.8) 5.1,-12.7 12.8,-12.7 13.6,-11.9 16.35,-11.9 16.4,-11.95 v1(16.425,-11.95)
  Layer 2 w0.15: v1(14.903,3.812) 14.903,3.497 15.3,3.1 15.3,2.651 16.6,1.351 16.6,-11.7 16.538,-11.762 16.538,-11.769 16.407,-11.9 v1@16.4,-11.9
  Bottom Layer w0.15: U1_DDC1.A3@14.8,5.8 14.8,5.719 14.9,5.619 14.9,3.815 v1(14.903,3.812)
NetR44_1: R44.1 R45.1 U4.19 | length 2.9
  Bottom Layer w0.15: R44.1@31,4 R45.1@32,4 ; R44.1@31,4.1 U4.19@31,6
NetR53_2: R53.2 U7.2 | length 1.7
  Top Layer w0.15: R53.2@17.4,10.1 U7.2@17.4,11.8
NetSJ1_1: SJ1.1 U3.5 | length 8.9
  Top Layer w0.15: v1(24.3,-5.2) U3.5@29,-5.2
  Bottom Layer w0.15: SJ1.1@23.4,-9 23.4,-8.75 23.9,-8.25 23.9,-5.6 v1(24.3,-5.2)
NetSJ1_2: SJ1.2 U1_DDC1.F8 U1_DDC2.F8 | length 23.3
  Top Layer w0.15: U1_DDC2.F8@18.8,-9.8 20.1,-9.8 v1(21.799,-8.099)
  Bottom Layer w0.15: U1_DDC1.F8@18.8,9.8 18.836,9.764 19.049,9.764 21.2,7.613 21.2,-7.5 v1(21.799,-8.099) ; SJ1.2@21.75,-8.55 SJ1.2@22,-8.8
NetSJ2_2: SJ2.2 U4.1 | length 9.7
  Top Layer w0.15: v1(25.1,12) 25.1,4.967 25.217,4.85 25.3,4.85 25.7,4.45 SJ2.2@25.7,4.2
  Bottom Layer w0.15: v1@25.15,12 v1(25.1,12) 25.1,12.168 25.15,12.118 U4.1@25.15,13.4
NetSJ3_2: SJ3.2 U4.5 | length 13.2
  Top Layer w0.15: v1(27.8,11.1) 27.8,11.2 27.85,11.15 29,10 29,2.3 29.213,2.087 29.213,1.487 SJ3.2@29.5,1.2
  Bottom Layer w0.15: U4.5@27.75,13.4 27.7,13.35 27.8,13.25 v1(27.8,11.1)
NetTP2_1: TP2.1 U1_DDC2.D8 U2.12 | length 15
  Top Layer w0.15: U1_DDC2.D8@18.8,-8.2 19.6,-8.2 21,-6.8 v1(26.6,-6.8)
  Bottom Layer w0.15: v1(26.6,-6.8) 26.6,-6.775 27.025,-7.2 27.7,-7.2 27.9,-7 29.4,-7 30.35,-6.05 U2.12@32.55,-6.05
NetTP6_1: TP6.1 U1_DDC1.H8 U1_DDC2.H8 U2.6 | length 44.5
  Top Layer w0.15: U1_DDC2.H8@18.8,-11.4 19.8,-11.4 v1(23.3,-7.9) 23.368,-7.9 23.468,-7.8 25.625,-7.8 25.9,-8.075 v1(25.9,-8.1)
  Bottom Layer w0.15: U1_DDC1.H8@18.8,11.4 19.8,11.4 20,11.2 20,9.8 21.8,8 21.8,-6.4 v1(23.3,-7.9) ; v1(25.9,-8.1) 26.4,-8.6 28.5,-8.6 29.5,-9.6 34.5,-9.6 35.6,-8.5 36,-8.1 38.55,-8.1 U2.6@38.65,-8
NetTP7_1: TP7.1 U1_DDC1.G7 U1_DDC2.G7 U2.8 | length 37.6
  Top Layer w0.15: U1_DDC2.G7@18,-10.6 18.4,-10.2 20.3,-10.2 22.224,-8.276 v1(22.6,-7.9) 23.1,-7.4 25.801,-7.4 26.101,-7.7 26.994,-7.7 v1(27.003,-7.709)
  Bottom Layer w0.15: U1_DDC1.G7@18,10.6 18.4,10.2 19.1,10.2 21.5,7.8 21.5,-6.9 22.5,-7.9 v1(22.6,-7.9) ; v1(27.003,-7.709) 27.006,-7.709 27.215,-7.5 27.9,-7.5 28.1,-7.3 30.1,-7.3 30.1,-7.37 30.543,-7.813 30.913,-7.813 31.6,-8.5 32.4,-8.5 U2.8@32.55,-8.65
NetTP10_1: TP10.1 U1_DDC1.F7 U1_DDC2.F7 U2.3 | length 44.4
  Top Layer w0.15: U1_DDC2.F7@18,-9.8 18.4,-9.4 19.2,-9.4 v1(20.8,-7.8) 21.5,-7.1 26,-7.1 26.2,-7.3 26.887,-7.3 27.487,-6.7 v1(27.5,-6.7)
  Bottom Layer w0.15: U1_DDC1.F7@18,9.8 18.405,9.395 18.994,9.395 20.9,7.489 20.9,-7.632 20.8,-7.732 v1(20.8,-7.8) ; v1(27.5,-6.7) 29.2,-6.7 30.1,-5.8 30.1,-4.4 30.5,-4 31.3,-4 31.5,-4.2 33.5,-4.2 33.7,-4.4 33.7,-4.9 34.5,-5.7 37.2,-5.7 37.55,-6.05 U2.3@38.65,-6.05
NetU1_DDC1_H7: U1_DDC1.H7
NetU1_DDC2_B8: U1_DDC1.D8 U1_DDC2.B8 | length 17.7
  Top Layer w0.15: U1_DDC2.B8@18.8,-6.6 v1(20.3,-6.6)
  Bottom Layer w0.15: U1_DDC1.D8@18.8,8.2 19.701,8.2 20.6,7.301 20.6,-6.1 20.348,-6.352 20.348,-6.552 v1(20.3,-6.6)
nRESET/SWDIO: P3.2 R50.1 U3.22 | length 16.8
  Top Layer w0.15: P3.2@25.6,-10.9 26.024,-10.9 29.224,-14.1 38.2,-14.1 38.617,-13.683 38.617,-12.733 U3.22@38.7,-12.65
  Bottom Layer w0.15: P3.2@25.7,-10.85 26.85,-10.85 R50.1@26.9,-10.9
SPI_CLK: TP8.1 U2.1 U2.4 U3.16 | length 14.9
  Top Layer w0.15: U3.16@33.9,-12.65 33.9,-10.1 ; v1(34.9,-6.7) 34.8,-6.7 34.4,-7.1 34.4,-9.6 33.9,-10.1 ; 33.9,-10.1 33.9,-10.7 33.9,-10.1
  Bottom Layer w0.15: v1(34.9,-6.7) U2.4@38.65,-6.7 ; U2.1@38.65,-4.75 39.65,-4.75 39.9,-5 39.9,-6.2 39.532,-6.568 39.232,-6.568 U2.4@39.1,-6.7
SPI_MISO: TP4.1 U2.11 U3.15 | length 9.1
  Top Layer w0.15: U3.15@33.1,-12.65 33.1,-10.4 ; v1(33.7,-6.7) 34.1,-7.1 34.1,-9.4 33.1,-10.4 ; 33.1,-10.4 v1(33.1,-11.1) 33.1,-10.4
  Bottom Layer w0.15: U2.11@32.55,-6.7 v1(33.7,-6.7)
SPI_MOSI: TP9.1 U2.9 U3.14 | length 6.2
  Top Layer w0.15: U3.14@32.3,-12.65 32.3,-10.7 33.6,-9.4 v1(33.6,-8)
  Bottom Layer w0.15: U2.9@32.55,-8 v1(33.6,-8)
  other v1: 32.3,-10.9
SWD_CLK: P3.3 R49.1 U3.23 | length 16.8
  Top Layer w0.15: P3.3@25.9,-12.1 26.8,-12.1 29.1,-14.4 38.7,-14.4 39.417,-13.683 39.417,-12.983 U3.23@39.5,-12.9
  Bottom Layer w0.15: P3.3@25.7,-12.1 26.8,-12.1 R49.1@26.9,-12
USB_N: D1.1 J1.A7 J1.B7 | length 6.3
  Top Layer w0.15: v1(37.2,9.1) 37.65,9.55 J1.A7@39.32,9.55
  Bottom Layer w0.15: v1@37.083,9.1 v1(37.2,9.1) 37.575,9.475 37.875,9.475 D1.1@38,9.6 ; D1.1@38.075,9.65 D1.1@38.2,9.65 39.05,9.65 39.8,8.9 J1.B7@40.58,8.9 J1.B7@40.6,8.9
USB_P: D1.3 J1.A6 J1.B6 | length 5
  Top Layer w0.15: v1(37.2,8.3) 37.268,8.3 37.368,8.2 37.9,8.2 38.675,8.975 39.245,8.975 39.37,9.1 40,9.1 J1.B6@40.5,9.6
  Bottom Layer w0.15: v1@37.117,8.3 v1(37.2,8.3) 37.575,7.925 37.875,7.925 D1.3@37.9,7.9 ; D1.3@38.075,7.75 D1.3@38.2,7.75
VREF_CURR: R1_DDC1.2 R1_DDC2.2 R2_DDC1.2 R2_DDC2.2 R3_DDC1.2 R3_DDC2.2 R4_DDC1.2 R4_DDC2.2 R5_DDC1.2 R5_DDC2.2 R6_DDC1.2 R6_DDC2.2 R7_DDC1.2 R7_DDC2.2 R8_DDC1.2 R8_DDC2.2 R9_DDC1.2 R9_DDC2.2 R10_DDC1.2 R10_DDC2.2 R11_DDC1.2 R11_DDC2.2 R12_DDC1.2 R12_DDC2.2 R13_DDC1.2 R13_DDC2.2 R14_DDC1.2 R14_DDC2.2 R15_DDC1.2 R15_DDC2.2 R16_DDC1.2 R16_DDC2.2 R17_DDC1.2 R17_DDC2.2 R18_DDC1.2 R18_DDC2.2 R19_DDC1.2 R19_DDC2.2 R20_DDC1.2 R20_DDC2.2 R21_DDC1.2 R21_DDC2.2 R22_DDC1.2 R22_DDC2.2 R23_DDC1.2 R23_DDC2.2 R24_DDC1.2 R24_DDC2.2 R25_DDC1.2 R25_DDC2.2 R26_DDC1.2 R26_DDC2.2 R27_DDC1.2 R27_DDC2.2 R28_DDC1.2 R28_DDC2.2 R29_DDC1.2 R29_DDC2.2 R30_DDC1.2 R30_DDC2.2 R31_DDC1.2 R31_DDC2.2 R32_DDC1.2 R32_DDC2.2 R33_DDC1.2 R33_DDC2.2 R34_DDC1.2 R34_DDC2.2 R46.2 TP20.1 U1_DDC1.A6 U1_DDC1.B6 U1_DDC2.A6 U1_DDC2.B6 U6.6 U6.7 | length 98.4
  Top Layer w0.15: R32_DDC1.2@5.3,-14 R33_DDC1.2@6.3,-14 R31_DDC1.2@7.3,-14 R30_DDC1.2@8.3,-14 ; R19_DDC1.2@5.3,-0.6 R18_DDC1.2@6.3,-0.6 R20_DDC1.2@7.3,-0.6 R21_DDC1.2@8.3,-0.6 8.375,-0.675 v1(8.699,-0.675) ; R16_DDC1.2@5.3,0.6 R17_DDC1.2@6.3,0.6 R15_DDC1.2@7.3,0.6 R14_DDC1.2@8.3,0.6 v1@8.7,0.6 ; R3_DDC1.2@5.3,13.8 R2_DDC1.2@6.3,13.8 R4_DDC1.2@7.3,13.8 R5_DDC1.2@8.3,13.8 v1(8.7,13.8) ; R30_DDC1.2@8.477,-13.877 8.752,-13.877 v1(8.8,-13.925) ; R29_DDC1.2@8.7,-11.5 8.7,-11.4 v1(9.2,-11.4) ; R28_DDC1.2@8.7,-10.2 v1(9.2,-10.2) ; R27_DDC1.2@8.7,-9 v1(9.2,-9) ; R26_DDC1.2@8.7,-7.8 v1(9.2,-7.8) ; R25_DDC1.2@8.7,-6.6 v1(9.2,-6.6) ; R24_DDC1.2@8.701,-5.401 v1(9.199,-5.401) ; R23_DDC1.2@8.7,-4.2 v1(9.2,-4.2) ; R22_DDC1.2@8.7,-3 9.175,-3 v1(9.2,-3.025) ; R13_DDC1.2@8.7,3 v1(9.1,3) v1@9.2,3 ; R12_DDC1.2@8.7,4.2 v1@9.2,4.2 ; R11_DDC1.2@8.7,5.4 v1@9.2,5.4 ; R10_DDC1.2@8.7,6.6 8.719,6.581 v1(9.097,6.581) ; R9_DDC1.2@8.7,7.8 v1@9.2,7.8 ; R8_DDC1.2@8.7,9 v1@9.2,9 ; R7_DDC1.2@8.7,10.2 v1@9.2,10.2 ; R6_DDC1.2@8.7,11.4 v1@9.2,11.4 ; v1(11.229,-1.829) 11.229,-1.879 11.45,-2.1 R1_DDC1.2@11.5,-2.1 ; R1_DDC1.2@11.6,-2.2 11.775,-2.375 11.888,-2.375 11.913,-2.4 13.2,-2.4 14.175,-1.425 15.125,-1.425 15.152,-1.452 15.16,-1.452 15.2,-1.493 v1@15.2,-1.5 ; v1@15.25,-1.475 v1(15.275,-1.5) ; v1@15.275,-1.475 17.9,-4.1 17.9,-4.949 v1(17.925,-4.974) 17.925,-5 17.8,-5 17.238,-5.562 17.238,-5.762 U1_DDC2.A6@17.2,-5.8 U1_DDC2.B6@17.2,-6.6 ; R34_DDC1.2@17.3,5.1 17.3,5.05 16.975,4.725 16.8,4.55 16.8,2.5 16.8,1.6 17.955,0.445 18.155,0.445 U6.7@18.3,0.3 ; U6.6@18.725,-0.325 U6.6@18.737,-0.337 ; U6.6@18.725,-0.2 U6.7@18.725,0.325
  Layer 1 w0.15: v1(8.7,13.8) 9.1,13.4 v1(9.1,11.4)
  Layer 2 w0.15: v1(8.8,-13.925) 8.8,-13.883 9.2,-13.483 v1(9.2,-11.4) v1(9.2,-10.2) v1(9.2,-9) v1(9.2,-7.8) v1(9.2,-6.6) v1(9.199,-5.401) ; v1@8.8,-0.7 8.8,-2.625 v1(9.2,-3.025) v1(9.2,-4.2) v1(9.199,-5.401) ; v1@8.8,-0.506 v1(8.8,0.6) 8.8,1.101 9.1,1.401 v1(9.1,3) v1(9.1,4.2) v1(9.1,5.4) 9.098,5.402 9.098,6.579 v1(9.097,6.581) ; v1@9.1,6.6 v1(9.1,7.8) v1(9.1,9) v1(9.1,10.2) v1(9.1,11.4)
  Bottom Layer w0.15: R19_DDC2.2@5.3,-13.8 R18_DDC2.2@6.3,-13.8 R20_DDC2.2@7.3,-13.8 R21_DDC2.2@8.3,-13.8 8.425,-13.925 v1(8.8,-13.925) ; R32_DDC2.2@5.3,-0.7 R33_DDC2.2@6.3,-0.7 R31_DDC2.2@7.3,-0.7 R30_DDC2.2@8.3,-0.7 ; R3_DDC2.2@5.3,0.6 R2_DDC2.2@6.3,0.6 R4_DDC2.2@7.3,0.6 R5_DDC2.2@8.3,0.6 v1(8.8,0.6) ; R16_DDC2.2@5.3,13.8 R17_DDC2.2@6.3,13.8 R15_DDC2.2@7.3,13.8 R14_DDC2.2@8.3,13.8 R14_DDC2.2@8.475,13.625 ; R30_DDC2.2@8.35,-0.65 8.375,-0.675 v1@8.755,-0.675 ; R22_DDC2.2@8.7,-11.4 v1(9.2,-11.4) ; R23_DDC2.2@8.7,-10.2 v1(9.2,-10.2) ; R24_DDC2.2@8.7,-9 v1(9.2,-9) ; R25_DDC2.2@8.7,-7.8 v1(9.2,-7.8) ; R26_DDC2.2@8.7,-6.6 v1(9.2,-6.6) ; R27_DDC2.2@8.701,-5.401 v1(9.199,-5.401) ; R28_DDC2.2@8.7,-4.2 v1(9.2,-4.2) ; R29_DDC2.2@8.7,-3 v1@9.2,-3 ; v1@8.755,-0.7 9.8,-0.7 10.9,-1.8 11.2,-1.8 11.4,-1.8 R1_DDC2.2@11.5,-1.9 ; R6_DDC2.2@8.8,3 v1(9.1,3) v1@9.2,3 ; R7_DDC2.2@8.8,4.2 v1(9.1,4.2) v1@9.2,4.2 ; R8_DDC2.2@8.8,5.4 v1(9.1,5.4) v1@9.2,5.4 ; R9_DDC2.2@8.8,6.6 8.819,6.581 v1(9.097,6.581) ; R10_DDC2.2@8.8,7.8 v1(9.1,7.8) v1@9.2,7.8 ; R11_DDC2.2@8.8,9 v1(9.1,9) v1@9.2,9 ; R12_DDC2.2@8.8,10.2 v1(9.1,10.2) v1@9.2,10.2 ; R13_DDC2.2@8.8,11.4 v1(9.1,11.4) v1@9.2,11.4 ; v1(11.229,-1.829) v1@11.229,-1.8 ; v1(15.275,-1.5) 15.313,-1.5 15.513,-1.3 16.7,-1.3 17.075,-0.925 17.125,-0.925 17.3,-0.75 R46.2@17.3,-0.7 17.3,-0.65 17.475,-0.475 17.525,-0.475 18,0 v1(19.3,0) ; v1(16.952,4.748) 17.2,4.995 U1_DDC1.B6@17.2,6.6 ; R34_DDC2.2@17.8,-4.55 17.925,-4.675 v1(17.925,-4.974)
VREF_DDC: R51.2 TP25.1 U6.1 U6.2 | length 3.3
  Top Layer w0.15: R51.2@12.7,0.5 12.75,0.5 12.925,0.325 U6.2@14.275,0.325 14.275,0.85 14.225,0.9 U6.1@14.2,0.9
  Top Layer w0.2: R51.2@12.7,0.6 TP25.1@12.7,1.6
VUSB: C7.1 C8.1 C10.1 C16.1 C17.1 C21.1 C23.1 D1.5 FB1.1 P4.5 P5.2 R44.2 R52.2 TP21.1 U4.20 U5.3 | length 61.5
  Top Layer w0.15: R52.2@21.6,14 21.6,13.975 21.775,13.8 26.2,13.8 26.6,14.2 31.6,14.2 32.975,12.825 C16.1@33.1,12.7 ; C23.1@24.9,-3.5 25.4,-3 26.2,-3 P4.5@26.3,-2.9 ; v1(30.1,-0.6) 30.148,-0.648 30.148,-0.996 31.226,-2.075 33.575,-2.075 36.1,-4.6 v1(36.1,-11.1) ; v1(30.3,7.2) 30.3,8.2 31.4,9.3 32.1,9.3 U5.3@32.5,9.7 ; C16.1@33,12.65 C16.1@33.25,12.4 33.25,11.2 33.25,9.95 U5.3@33.2,9.9 ; C16.1@33.25,12.4 37.132,12.4 37.232,12.5 v1(37.3,12.5) TP21.1@37.3,13.4
  Bottom Layer w0.15: P4.5@26.6,-2.97 27.73,-2.97 v1(30.1,-0.6) 31.2,0.5 31.2,2.825 31.075,2.95 R44.2@30.95,2.95 ; C8.1@29.9,3.3 C10.1@29.9,4.3 ; C8.1@29.95,3.3 30.25,3 R44.2@31,3 ; C10.1@30,4.5 30.05,4.5 30.075,4.525 30.075,4.575 30.35,4.85 U4.20@30.35,6 30.35,7.082 30.3,7.132 v1(30.3,7.2) ; D1.5@35.8,8.7 36.025,8.925 36.225,8.925 36.6,9.3 36.6,9.7 37.45,10.55 FB1.1@37.45,11.7 37.3,11.85 v1(37.3,12.5) C7.1@37.3,13.2 ; C21.1@36.1,-11.8 36.1,-12.883 36.147,-12.93 36.147,-13.247 P5.2@36.3,-13.4 ; C21.1@36.1,-11.7 v1(36.1,-11.1)
pads on no net: J1. J1.A2 J1.A3 J1.A5 J1.A8 J1.A10 J1.A11 J1.B2 J1.B3 J1.B5 J1.B8 J1.B10 J1.B11 J1.GND OSC1.1 P1.19 P1.20 P2.19 P2.20 P6.19 P6.20 P7.19 P7.20 U1_DDC1.E8 U1_DDC2.E8 U3.2 U3.8 U3.18 U3.20 U3.24 U3.25 U3.26 U3.27 U3.30 U3.38 U3.39 U3.44 U4.8 U4.12 U4.13 U4.14 U4.22 U4.23 U4.24 U4.27 U4.28

## Polygon pours and split planes (outlines as drawn)
GND on Top Layer "NONET_L-01_P-001" (solid, remove dead copper, pour order 1): 21.2,15 21.2,11.6 20.6,11 18.4,11 18,10.6 18,5.3 19.9,3.4 19.9,-1.9 18.4,-3.4 18.4,-5.1 17.8,-5.7 17.8,-11.8 18.7,-12.7 18.7,-15 48,-15 48,15
AGND on Top Layer "NONET_L-01_P-001" (solid, remove dead copper, pour order 0): 21.1,15 21.1,11.6 20.6,11.1 18.4,11.1 17.9,10.6 17.9,5.3 19.8,3.4 19.8,-1.9 18.3,-3.4 18.3,-5.1 17.7,-5.7 17.7,-11.8 18.6,-12.7 18.6,-15 0,-15 0,15
3V3 on Layer 2 "3V3_L03_P007" (solid, remove dead copper, pour order 7): 21.2,15 21.2,11.6 20.6,11 18.4,11 18,10.6 18,5.3 19.9,3.4 19.9,-1.9 18.4,-3.4 18.4,-5.1 17.8,-5.7 17.8,-11.8 18.7,-12.7 18.7,-15 48,-15 48,15
AVDD_5V on Layer 2 "AVDD_5V_L03_P002" (solid, remove dead copper, pour order 2): 21.1,15 21.1,11.6 20.6,11.1 18.4,11.1 17.9,10.6 17.9,5.3 19.8,3.4 19.8,-1.9 18.3,-3.4 18.3,-5.1 17.7,-5.7 17.7,-11.8 18.6,-12.7 18.6,-15 0,-15 0,15
GND on Layer 1 "GND_L02_P006" (solid, remove dead copper, pour order 6): 21.2,15 21.2,11.6 20.6,11 18.4,11 18,10.6 18,5.3 19.9,3.4 19.9,-1.9 18.4,-3.4 18.4,-5.1 17.8,-5.7 17.8,-11.8 18.7,-12.7 18.7,-15 48,-15 48,15
AGND on Layer 1 "AGND_L02_P003" (solid, remove dead copper, pour order 3): 21.1,15 21.1,11.6 20.6,11.1 18.4,11.1 17.9,10.6 17.9,5.3 19.8,3.4 19.8,-1.9 18.3,-3.4 18.3,-5.1 17.7,-5.7 17.7,-11.8 18.6,-12.7 18.6,-15 0,-15 0,15
GND on Bottom Layer "GND_L04_P005" (solid, remove dead copper, pour order 5): 21.2,15 21.2,11.6 20.6,11 18.4,11 18,10.6 18,5.3 19.9,3.4 19.9,-1.9 18.4,-3.4 18.4,-5.1 17.8,-5.7 17.8,-11.8 18.7,-12.7 18.7,-15 48,-15 48,15
AGND on Bottom Layer "AGND_L04_P004" (solid, remove dead copper, pour order 4): 21.1,15 21.1,11.6 20.6,11.1 18.4,11.1 17.9,10.6 17.9,5.3 19.8,3.4 19.8,-1.9 18.3,-3.4 18.3,-5.1 17.7,-5.7 17.7,-11.8 18.6,-12.7 18.6,-15 0,-15 0,15

## Keep-outs
Keep-Out Layer:
  circle w0.2: c23.8,0 r1.6
  lines w0.2: 0,-13.4 ccw(c1.6,-13.4) 1.6,-15 43.3,-15 ccw(c43.3,-14) 44.3,-14 44.3,0 cw(c46.231,0) 44.866,1.366 47.717,4.217 ccw(c47.034,4.9) 48,4.9 48,12.9 ccw(c45.9,12.9) 45.9,15 1.6,15 ccw(c1.6,13.4) 0,13.4 0,0 0,-13.4

## Silkscreen, mask and mechanical layers (free items; w line width, h text height)
Top Overlay:
  drawing of 3995 lines, arcs and shapes, not listed
  text "v1.2 - Nov 20" at 34.255,-14.673 h1.3
  text "14MV1" at 13,-14.7 h2.5

## Dimensions
45.9,15 to 43.3,-15 on Mechanical 1
0,13.4 to 48,12.9 on Mechanical 1